# Altium PCB Main_PCB_V1R0_DDMMYY.PcbDoc
Units mil, origin at the board's own origin, x right, y up, seen from the top; angles counter-clockwise.
Board outline 4000 x 6929.13 mil, 2 copper layers (Top Layer, Bottom Layer), stack 58.66 mil thick; 97 components, 45 nets, 274 pads, 18 vias.
Unrouted connection lines stored in the file: 211.
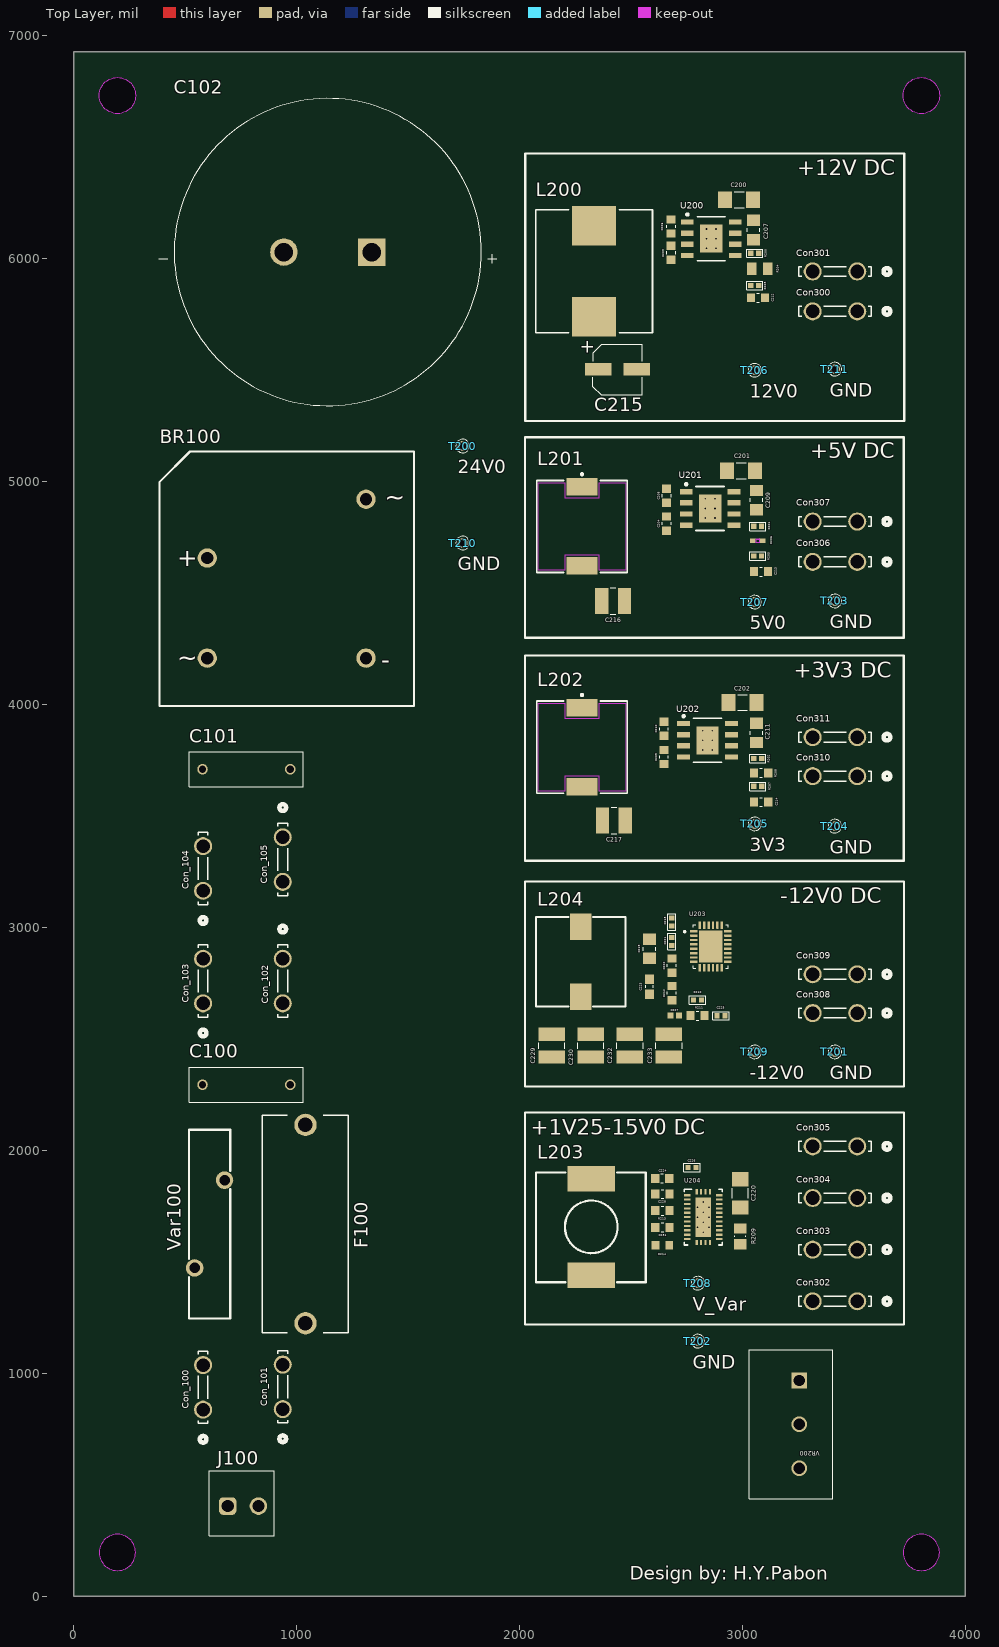
[diagram p0: Top Layer view]
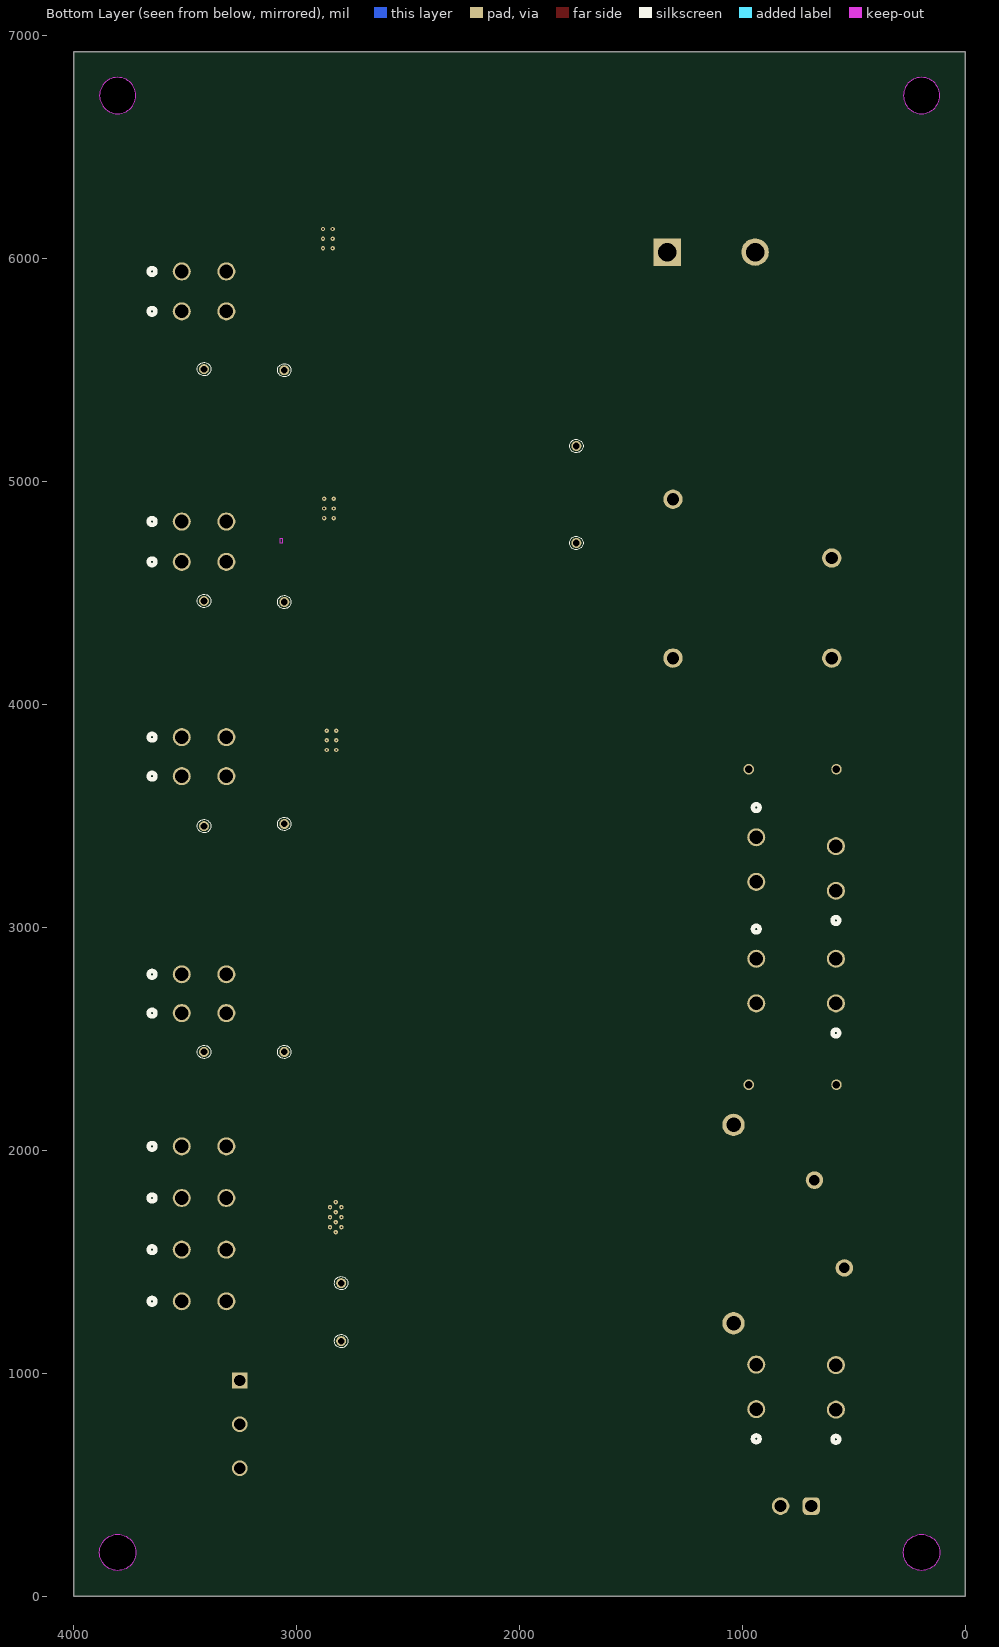
[diagram p1: Bottom Layer view, seen from below]

## Layer stack, top to bottom
Top Solder: solder mask 0.4, Solder Resist, Dk 3.5
Top Layer: signal copper 1.18
Dielectric 1: dielectric 56.3, FR-4, Dk 4.8
Bottom Layer: signal copper 1.18
Bottom Solder: solder mask 0.4, Solder Resist, Dk 3.5

## Board outline
0,0 0,6929.13 4000,6929.13 4000,0
cut-out: 115.22,196.85 ccw(c196.6,196.85) 196.6,115.47 ccw(c196.6,196.85) 277.98,196.85 ccw(c196.6,196.85) 196.6,278.23 ccw(c196.6,196.85)
cut-out: 3721.38,196.85 ccw(c3802.76,196.85) 3802.76,115.47 ccw(c3802.76,196.85) 3884.14,196.85 ccw(c3802.76,196.85) 3802.76,278.23 ccw(c3802.76,196.85)
cut-out: 3802.76,6650.91 cw(c3802.76,6732.28) 3721.38,6732.28 cw(c3802.76,6732.28) 3802.76,6813.66 cw(c3802.76,6732.28) 3884.14,6732.28 cw(c3802.76,6732.28)
cut-out: 196.6,6650.91 cw(c196.6,6732.28) 115.22,6732.28 cw(c196.6,6732.28) 196.6,6813.66 cw(c196.6,6732.28) 277.98,6732.28 cw(c196.6,6732.28)

## Design rules (kind name [scope] priority, off if disabled: settings)
Clearance [All] p1: gap=10 ignorepadtopadclearanceinfootprint=FALSE
PolygonConnect [All] p1: connectstyle=Relief reliefconductorwidth=10 reliefentries=4 polygonreliefangle="90 Angle" airgapwidth=10
RoutingVias [All] p1: holewidth=28 width=50 viastyle="Through Hole" minholewidth=28 minwidth=50 maxholewidth=28 maxwidth=50
SolderMaskExpansion [All] p1: expansion=4 istentingtop=FALSE
SupplyNets "Schematic Supply Nets_9" [InNet('-12V0')] p1: voltage=0.000
SupplyNets "Schematic Supply Nets_2" [InNet('var')] p2: voltage=0.000
SupplyNets "Schematic Supply Nets_8" [InNet('12V0')] p3: voltage=0.000
SupplyNets "Schematic Supply Nets_5" [InNet('24V')] p4: voltage=0.000
SupplyNets "Schematic Supply Nets_4" [InNet('5V0')] p5: voltage=0.000
SupplyNets "Schematic Supply Nets_3" [InNet('3V3')] p6: voltage=0.000
SupplyNets "Schematic Supply Nets_1" [InNet('24V0')] p7: voltage=0.000
SupplyNets "Schematic Supply Nets" [InNet('GND')] p8: voltage=0.000
Width [All] p1: maxlimit=10 minlimit=10 preferedwidth=10
30 further rules are at their usual default settings.

## Classes and differential pairs
component class 300_Externals: Con300 Con301 Con302 Con303 Con304 Con305 Con306 Con307 Con308 Con309 Con310 Con311
component class 200_DC-DC: C200 C201 C202 C203 C204 C205 C206 C207 C208 C209 C210 C211 C212 C213 C214 C215 C216 C217 C218 C219 C220 C221 C222 C223 C224 C225 C226 C227 C228 C229 C230 C231 C232 C233 L200 L201 L202 L203 L204 R200 R201 R202 R203 R204 R205 R206 R207 R208 R209 R210 R211 R212 R213 R214 T200 T201 T202 T203 T204 T205 T206 T207 T208 T209 T210 T211 U200 U201 U202 U203 U204 VR200
component class 100_AC-DC: BR100 C100 C101 C102 Con_100 Con_101 Con_102 Con_103 Con_104 Con_105 F100 J100 SW100 Var100

## Components (designator, comment, footprint, x,y, rotation, side; value= is the part's Value field where it differs from the comment)
BR100 "1kV_35A" BR_1kV_35A_GBPC-W 955.49,4565 r0 top
C100 "2.2nF_300V" Cap_2.2nF_300V 775,2295 r180 top value=2.2nF
C101 "2.2nF_300V" Cap_2.2nF_300V 775,3710 r0 top value=2.2nF
C102 "4700uF_63V" C_4700uF_63V_Electrolytic 1140,6030 r180 top value=4700uF
C200 "10uF 50V" 1206 2985,6265 r0 top value=10uF
C201 "10uF 50V" 1206 2994.1,5049.7 r0 top value=10uF
C202 "10uF 50V" 1206 2999.7,4009.7 r0 top value=10uF
C203 "100nF 25V" 0603 2680,6027 r90 top value=0.1uF
C204 "100nF 25V" 0603 2660,4812 r90 top value=0.1uF
C205 "100nF 25V" 0603 2648.35,3765 r90 top value=0.1uF
C206 "100nF 25V" 0603 2680,6145 r270 top value=0.1uF
C207 "1uF 25V" 0805#1 3049.8,6128.9 r90 top value=1uF
C208 "100nF 25V" 0603 2660,4937 r270 top value=0.1uF
C209 "1uF 25V" 0805#1 3062.88,4917.22 r90 top value=1uF
C210 "100nF 25V" 0603 2648.35,3891.5 r270 top value=0.1uF
C211 "1uF 25V" 0805#1 3063.34,3873.34 r90 top value=1uF
C212 "100pF 550" 0603 3070.28,5825 r0 top value=100pF
C213 "100pF 550" 0603 3083.35,4596.81 r0 top value=100pF
C214 "100pF 550" 0603 3083.82,3563.34 r180 top value=100pF
C215 "47uF 35V" RADIAL-CAN-SMD_Diax5mm_Hx6.1mm 2440,5505 r0 top value=47uF
C216 "47uF 1210" 1210 2420,4465 r0 top value=47uF
C217 "47uF 1210" 1210 2423.35,3480 r0 top value=47uF
C218 "0.1uF 50V" 0402 2683.34,3024.9 r270 top value=0.1uF
C219 "22uF 25V" 0805#1 2583.34,2904.9 r270 top value=22uF
C220 "10uF 50V" 1206 2990,1808 r90 top value=10uF
C221 "2.2uF" 0402 2683.34,2937.46 r90 top
C222 "10nF 50V" 0603 2683.34,2829.31 r90 top value=10nF
C223 "3.3nF_25V" Cap_3.3nF_25V_X7R0603 2583.34,2734.9 r90 top value=3.3nF
C224 "0.47uF 25V" 0603 2640,1875 r180 top value=0.47uF
C225 "0.1uF 50V" 0402 2904.06,2604.9 r0 top value=0.1uF
C226 "2.2uF" 0402 2773.51,1923.6 r0 top
C227 "220pF 50V" 0402_RF 2696.34,2604.9 r0 top value=220pF
C228 "150pF 50V" 0603 2640.91,1805 r0 top value=150pF
C229 "22uF 25V" 1210 2145,2470 r90 top value=22uF
C230 "22uF 25V" 1210 2320,2470 r90 top value=22uF
C231 "47pF 16V" 0603 2640.91,1655 r0 top value=47pF
C232 "22uF 25V" 1210 2495,2470 r90 top value=22uF
C233 "22uF 25V" 1210 2670,2470 r90 top value=22uF
Con300 "C_2x1_TH" Con_2x1_TH_6.3mm 3415,5763.97 r180 top
Con301 "C_2x1_TH" Con_2x1_TH_6.3mm 3415,5943.04 r180 top
Con302 "C_2x1_TH" Con_2x1_TH_6.3mm 3415,1323.67 r180 top
Con303 "C_2x1_TH" Con_2x1_TH_6.3mm 3415,1555.33 r180 top
Con304 "C_2x1_TH" Con_2x1_TH_6.3mm 3415,1787 r180 top
Con305 "C_2x1_TH" Con_2x1_TH_6.3mm 3415,2018.67 r180 top
Con306 "C_2x1_TH" Con_2x1_TH_6.3mm 3415,4640.37 r180 top
Con307 "C_2x1_TH" Con_2x1_TH_6.3mm 3415,4821.37 r180 top
Con308 "C_2x1_TH" Con_2x1_TH_6.3mm 3415,2616.49 r180 top
Con309 "C_2x1_TH" Con_2x1_TH_6.3mm 3415,2790.46 r180 top
Con310 "C_2x1_TH" Con_2x1_TH_6.3mm 3415,3679.16 r180 top
Con311 "C_2x1_TH" Con_2x1_TH_6.3mm 3415,3854.01 r180 top
Con_100 "C_2x1_TH" Con_2x1_TH_6.3mm 580.72,937.58 r90 top
Con_101 "C_2x1_TH" Con_2x1_TH_6.3mm 938,939.81 r90 top
Con_102 "C_2x1_TH" Con_2x1_TH_6.3mm 938,2760 r270 top
Con_103 "C_2x1_TH" Con_2x1_TH_6.3mm 580.72,2760 r90 top
Con_104 "C_2x1_TH" Con_2x1_TH_6.3mm 580.72,3265 r90 top
Con_105 "C_2x1_TH" Con_2x1_TH_6.3mm 938,3305 r270 top
F100 "500V 10A" FUSE_HLD_CARTRIDGE_5x20mm 1040,1670 r90 top
J100 "Con_2P" CON_2x1_TH_3.5mm_TB 760,405 r0 top
L200 "6uH_9.5A" L_6uH_9.5A_SMD,13x12.8mm 2334.62,5944.18 r270 top value=6uH
L201 "4.7uH_5A" L_4.7uH_7A_SMD 2280.49,4799.18 r0 top value=4.7uH
L202 "4.7uH_7A" L_4.7uH_7A_SMD 2280.49,3809.18 r0 top value=4.7uH
L203 "SMDRI127-150MT" L_15uH_4.5A_SMD,12.3x12.3mm 2321.91,1657.52 r270 top value=15uH
L204 "7.8uH_8A" L_7.8uH_8A_SMD,10.5x10.2mm 2068.88,3067.09 r270 top value=7.8uH
R200 "100K 1/16W" 0402 3055,6025 r180 top value=100k
R201 "100K 1/16W" 0402 3068.08,4799.59 r180 top value=100k
R202 "100K 1/16W" 0402 3068.54,3758.34 r180 top value=100k
R203 "10k 1/16W" 0402 3055,5880 r180 top value=10k
R204 "523 OHM_130mW" Res_523_SMD0805_130mW 3077.36,5955 r0 top value=523
R205 "10k 1/16W" 0402 3068.08,4666.81 r180 top value=10k
R206 "1.37k_100mW" Res_1.37k_0402_100mW 3069.05,4735 r180 top value=1.37k
R207 "100K 1/16W" 0402 3068.53,3633.33 r0 top value=100k
R208 "22k1 1/10W" 0603 3083.82,3693.34 r180 top value=22k1
R209 "100k 1/8W" 0805#2 2990,1615 r90 top value=100k
R210 "100K 1/16W" 0402 2798.34,2674.9 r0 top value=100k
R211 "240k 1/10W" 0603 2798.34,2604.9 r0 top value=240k
R212 "1k33 1/10W" 0603 2683.34,2705.89 r270 top value=1k33
R213 "100k 1/10W" 0603 2640.91,1730 r180 top value=100k
R214 "MCR03EZPFX7151" "RES 7.15k_SMD-0603" 2640.91,1575 r0 top value=7.15k
T200 "24V0" TP_TH_30mil 1745,5160 r90 top
T201 "GND" TP_TH_30mil 3415,2442.31 r90 top
T202 "GND" TP_TH_30mil 2800,1145 r90 top
T203 "GND" TP_TH_30mil 3415,4465 r90 top
T204 "GND" TP_TH_30mil 3415,3455 r90 top
T205 "3V3" TP_TH_30mil 3055,3465 r90 top
T206 "12V0" TP_TH_30mil 3055,5500 r90 top
T207 "5V0" TP_TH_30mil 3055,4460 r90 top
T208 "V_Var" TP_TH_30mil 2800,1405 r90 top
T209 "-12V0" TP_TH_30mil 3055,2442.31 r90 top
T210 "GND" TP_TH_30mil 1745,4725 r90 top
T211 "GND" TP_TH_30mil 3415,5505 r90 top
U200 "SY8205FCC" SOIC127P600X140_HS-9N 2860,6090 r0 top
U201 "SY8205FCC" SOIC127P600X140_HS-9N 2855,4880 r0 top
U202 "SY8205FCC" SOIC127P600X140_HS-9N 2843.35,3840 r0 top
U203 "IC REG BUCK ADJ 4A 28QFN" "IC REG BUCK ADJ 4A 28QFN" 2858.34,2914.9 r0 top
U204 "LM76003RNPR" DCDC_ADJ_3.5A_WQFN-30-EP(4x6) 2824.36,1701.04 r0 top
Var100 "VAR_423V~517V_6.5kA" "VARISTOR 423V~517V 6.5kA P=10mm" 610,1670 r90 top
VR200 "500k 1/5W" Pot_3x1_5mm_TH 3255,771.85 r0 top value=500k

## Footprints (in the part's own frame and the unit in brackets; to place one, negate y for a bottom-side part, rotate by r counter-clockwise, add the part's x,y. Pads: shape width x height; smd on the part's side, far side on the other; paste and mask are expansions set on the pad)
0402 [mm] "1005 Metric / 20190221 / C-A.Serna.A"
  rect 0.6x0.6 smd: 1(-0.45,0) 2(0.45,0)
  silkscreen extent -0.92,-0.47 0.92,0.47, body extent -0.5,-0.25 0.5,0.25, height 0.55
0402_RF [mil] "1005 Metric / 20190221 / C-A.Serna.A"
  rect 27x27 smd: 1(-19.5,0) 2(19.5,0)
  body extent -20,-10 19,10, height 22
0603 [mil] "1608 Metric / 20190221 / C-A.Serna.A"
  rect 37x40 smd: 1(-31.5,0) 2(31.5,0)
  silkscreen extent -6,-20 6,20, body extent -31,-16 32,16, height 12
0805#1 [mm] "2012 Metric / 20190221 / C-A.Serna.A"
  rect 1.3x1.5 smd: 1(-1.1,0) 2(1.1,0)
  silkscreen extent -0.2,-0.7 0.2,0.7, body extent -1.13,-0.7 1.07,0.7, height 1
0805#2 [mm] "2012 metric/ 20190327 / V-A.Patino"
  rect 1.15x1.45 smd: 1(-0.9,0) 2(0.9,0)
  silkscreen extent -0.05,-0.62 0.05,0.63, body extent -1.1,-0.72 1.1,0.73, height 1.3
1206 [mm] "3216 Metric / 20190221 / C-A.Serna.A"
  rect 1.6x1.9 smd: 1(-1.6,0) 2(1.6,0)
  silkscreen extent -0.55,-0.9 0.57,0.9, body extent -1.6,-0.8 1.6,0.8, height 2
1210 [mm] "3225 Metric / 20190221 / C-A.Serna.A"
  rect 1.5x3 smd: 1(-1.3,0) 2(1.3,0)
  silkscreen extent -0.32,-1.5 0.31,1.5, body extent -1.78,-1.4 1.72,1.4, height 2.8
BR_1kV_35A_GBPC-W [mm] "/20261030/H.Y.Pabón"
  round 2.2 hole 1.4: 1(-9.05,2.35) 2(-9.05,-9.05) 3(9.05,-9.05) 4(9.05,9.05)
  silkscreen extent -14.5,-14.5 14.5,14.5
C_4700uF_63V_Electrolytic [mm] "/20261030/H.Y.Pabón"
  rect 3.116x3.116 / inner round 3.116 / far side rect 3.116x3.116 hole 2.1 mask+0.102: 1(-5,0)
  round 3.116 hole 2.1 mask+0.102: 2(5,0)
  silkscreen extent -19.25,-17.5 19.25,17.5, body extent -17.5,-17.48 17.5,17.49, height 37
Cap_2.2nF_300V [mm] "/20261111/H.Y.Pabón"
  round 1.2 hole 0.85 mask+0.102: 1(-5,0) 2(5,0)
  silkscreen extent -6.5,-2 6.5,2, body extent -6.5,-2 6.5,2, height 9
Cap_3.3nF_25V_X7R0603 [mm] "/20261028/"
  rect 1.1x1 smd paste+0 mask+0.102: 1(-0.85,0) 2(0.85,0)
  silkscreen extent -0.15,-0.45 0.15,0.45, body extent -0.8,-0.4 0.8,0.4, height 0.9
CON_2x1_TH_3.5mm_TB [mm] "/ 20190222 / C-A.Serna.A"
  rrect50% 2x2 hole 1.397: 1(-1.75,0)
  round 2 hole 1.397: 2(1.75,0)
  silkscreen extent -3.87,-3.4 3.53,4, body extent -3.87,-3.4 3.53,4, height 8.6
Con_2x1_TH_6.3mm [mil] "/20261111/"
  round 81 hole 61: 1(-100,0) 2(100,0)
  silkscreen extent -248,-22 162,22, body extent -131,-31 180,0, height 531
DCDC_ADJ_3.5A_WQFN-30-EP(4x6) [mm] "/20261027/"
  rect 0.75x0.25 smd paste+0 mask+0.051: 1(-1.825,2.5) 2(-1.825,2) 3(-1.825,1.5) 4(-1.825,1) 5(-1.825,0.5) 6(-1.825,0) 7(-1.825,-0.5) 8(-1.825,-1) 9(-1.825,-1.5) 10(-1.825,-2) 11(-1.825,-2.5) 16(1.825,-2.5) 17(1.825,-2) 18(1.825,-1.5) 19(1.825,-1) 20(1.825,-0.5) 21(1.825,0) 22(1.825,0.5) 23(1.825,1) 24(1.825,1.5) 25(1.825,2) 26(1.825,2.5)
  rect 0.25x0.6 smd paste+0 mask+0.051: 12(-0.75,-2.9) 13(-0.25,-2.9) 14(0.25,-2.9) 15(0.75,-2.9) 27(0.75,2.9) 28(0.25,2.9) 29(-0.25,2.9) 30(-0.75,2.9)
  rect 1.8x4.5 smd paste-2.237 mask+0.051: 31(0,0)
  round 0.5 / inner round 1.524 / far side round 0.5 hole 0.203 paste-2539.97 mask+0.051: V(-0.65,-1.14) V(-0.65,0) V(-0.65,1.14) V(0,-1.71) V(0,-0.57) V(0,0.57) V(0,1.71) V(0.65,-1.14) V(0.65,0) V(0.65,1.14)
  silkscreen extent -2.17,-3.17 2.17,3.17
FUSE_HLD_CARTRIDGE_5x20mm [mil] "/20201016/C-A.Serna.A"
  round 100 hole 65: 1(-444.88,0) 2(444.88,0)
  silkscreen extent -488,-192 488,194, body extent -488,-192 488,194, height 506
"IC REG BUCK ADJ 4A 28QFN" [mm] "/20261028/"
  rrect25% 0.86x0.27 smd paste+0 mask+0: 1(-1.935,1.75) 2(-1.935,1.25) 3(-1.935,0.75) 4(-1.935,0.25) 5(-1.935,-0.25) 6(-1.935,-0.75) 7(-1.935,-1.25) 8(-1.935,-1.75) 15(1.935,-1.75) 16(1.935,-1.25) 17(1.935,-0.75) 18(1.935,-0.25) 19(1.935,0.25) 20(1.935,0.75) 21(1.935,1.25) 22(1.935,1.75)
  rrect25% 0.27x0.86 smd paste+0 mask+0: 9(-1.25,-2.435) 10(-0.75,-2.435) 11(-0.25,-2.435) 12(0.25,-2.435) 13(0.75,-2.435) 14(1.25,-2.435) 23(1.25,2.435) 24(0.75,2.435) 25(0.25,2.435) 26(-0.25,2.435) 27(-0.75,2.435) 28(-1.25,2.435)
  rect 2.65x3.65 smd paste-3 mask+0.05: 29(0,0)
  silkscreen extent -3.09,-2.5 2,2.5
L_4.7uH_7A_SMD [mm] "SMD Shielded Power Inductor, 2-leads, body 10x10mm"
  rect 3.5x2 smd: 1(0,4.5) 2(0,-4.5)
  Top Layer keep-out region: 5,-5 1.95,-5 1.95,-3.3 -1.95,-3.3 -1.95,-5 -5,-5 -5,5 -1.95,5 -1.95,3.3 1.95,3.3 1.95,5 5,5
  silkscreen extent -5.15,-5.25 5.15,6.07, body extent -5,-5 5,5, height 2.85
L_6uH_9.5A_SMD,13x12.8mm [mm] "SMolded Inductor, 2-Leads, Body 13,00x12,80mm, IPC Medium Density"
  rect 4.5x5 smd: 1(-5.175,0) 2(5.175,0)
  silkscreen extent -7,-6.65 7,6.65, body extent -7.22,-6.65 7.22,6.65, height 5
L_7.8uH_8A_SMD,10.5x10.2mm [mm] "/20261028/"
  rect 3x2.4 smd: 1(1.602,5.227) 2(9.601,5.227)
  silkscreen extent 0.5,0.13 10.7,10.33
L_15uH_4.5A_SMD,12.3x12.3mm [mm]
  rect 2.9x5.4 smd paste+0 mask+0.05: 1(-5.5,0) 2(5.5,0)
  silkscreen extent -6.2,-6.3 6.3,6.2
Pot_3x1_5mm_TH [mm] "20190528/ V-A.Patino"
  rect 1.8x1.8 hole 1.27: 1(0,5)
  round 1.8 hole 1.27: 2(0,0) 3(0,-5)
  silkscreen extent -5.7,-8.5 3.8,8.5, body extent -5.64,-8.55 18.86,8.45, height 21
RADIAL-CAN-SMD_Diax5mm_Hx6.1mm [mm] "20190618 / M.X-Arias"
  rect 3x1.4 smd: 1(-2.2,0) 2(2.2,0)
  silkscreen extent -2.82,-2.92 2.82,2.84, body extent -3.24,-2.73 3.26,2.79, height 6.15
"RES 7.15k_SMD-0603" [mm] "RES 7.15kΩ ±1% 100mW 0603"
  rect 0.87x0.93 smd paste+0 mask+0.102: 1(-0.78,0) 2(0.78,0)
  body extent -0.8,-0.4 0.8,0.4, height 0.55
Res_1.37k_0402_100mW [mm] "/20261023/ H.Y.Pabón"
  rect 0.656x0.5 smd paste+0 mask+0: 1(-0.528,-0.001) 2(0.578,-0.001)
  Top Layer keep-out region: -0.149,-0.2 -0.149,0.199 0.199,0.199 0.199,-0.2
  Keep-Out Layer region: -0.149,-0.251 -0.149,0.249 0.199,0.249 0.199,-0.251
  body extent -0.5,-0.25 0.55,0.25, height 0.71
Res_523_SMD0805_130mW [mm] "RES 523Ω ±0.1% 130mW 0805"
  rect 1.1x1.45 smd: 1(-0.9,0) 1(-0.9,0) 2(0.9,0) 2(0.9,0)
  body extent -1.1,-0.72 1.1,0.72, height 0.5
SOIC127P600X140_HS-9N [mm] "SOIC, 8-Leads, Body 4,90x3,90mm, Pitch 1,27mm, Thermal Pad 3,20x2,55mm, IPC Medium Density"
  rect 1.45x0.6 smd: 1(-2.725,1.905) 2(-2.725,0.635) 3(-2.725,-0.635) 4(-2.725,-1.905) 5(2.725,-1.905) 6(2.725,-0.635) 7(2.725,0.635) 8(2.725,1.905)
  rect 2.55x3.2 smd: 9(0,0)
  silkscreen extent -2.85,-2.5 1.6,2.88, body extent -3,-2.5 3,2.5, height 1.4
TP_TH_30mil [mil] "/ 20190222 / C-A.Serna.A"
  round 45 hole 30: 1(0,0)
  silkscreen extent -30,-30 30,30
"VARISTOR 423V~517V 6.5kA P=10mm" [mm] "/20261111/H.Y.Pabón"
  round 2 hole 1.2 paste-2539.97 mask+0.05: 1(-5,1.7) 2(5,-1.7)
  silkscreen extent -10.75,-2.35 10.75,2.35

## Part data
BR100: library part BR_1kV_35A_GBPC-W, "BRIDGE RECT 1kV 35A GBPC-W", Manufacturer=VISHAY, Manufacturer Part Number=GBPC3510W-E4/51, Supplier Part Number 1=C435891, ComponentLink1Description=LCSC, ComponentLink1URL=https://www.lcsc.com/es/product-detail/C435891.html?s_z=n_q_GBPC3510&spm=wm.fly.bg.0.xh&lcsc_vid=TwUMAgFRQ1ZdBABSRVJXAwZQE1ANUAIARVkMAlZRRVUxVlNfRFJWV1RXRVBZUjsOAxUeFF5JWBYZEEoKFBINSQcJGk4LFEsFFhULAAsUDk5fVVBIHxUDCw%3D%3D, ComponentLink2Description=DataSheet, ComponentLink2URL=https://www.lcsc.com/datasheet/C435891.pdf?spm=wm.sxq.inf.ggs___wm.fly.bg.0.xh&lcsc_vid=TwUMAgFRQ1ZdBABSRVJXAwZQE1ANUAIARVkMAlZRRVUxVlNfRFJWV1RXRVBZUjsOAxUeFF5JWBYZEEoKFBINSQcJGk4LFEsFFhULAAsUDk5fVVBIHxUDCw%3D%3D, Last modified by=H.Y.Pabón, Last modified date=20261030, Reel Stock=N/A, Supplier 1=LCSC
C100 C101: library part Cap_2.2nF_300V_TH, "CAP SAFETY 2.2nF ±10% 300V TH", Manufacturer=TDK, Manufacturer Part Number=B32021A3222K000, Supplier Part Number 1=C341260, ComponentLink1Description=LCSC, ComponentLink1URL=https://www.lcsc.com/es/product-detail/C341260.html?s_z=n_q_t_y2%2520capacitor&spm=wm.fly.bg.0.xh&lcsc_vid=Q1RbAgBVRVQPAlZeQVRYVAdeFgVZXwFeTgNaVQJTEwUxVlNfQ1VaXlJRT1dbVzsOAxUeFF5JWBYZEEoKFBINSQcJGk4LFEsVEgAcBAw%3D, ComponentLink2Description=DataSheet, ComponentLink2URL=https://www.lcsc.com/datasheet/C341260.pdf?spm=wm.sxq.inf.ggs___wm.fly.bg.0.xh&lcsc_vid=Q1RbAgBVRVQPAlZeQVRYVAdeFgVZXwFeTgNaVQJTEwUxVlNfQ1VaXlJRT1dbVzsOAxUeFF5JWBYZEEoKFBINSQcJGk4LFEsVEgAcBAw%3D, Last modified by=H.Y.Pabón, Last modified date=20261111, Reel Stock=N/A, Supplier 1=LCSC
C102: library part C_4700uF_63V_Electrolytic, "4700 µF 63 V Aluminum Electrolytic Capacitors Radial, Can - Snap-In 3000 Hrs @ 105°C", Manufacturer=Nichicon, Manufacturer Part Number=LGU1J472MELC, Supplier Part Number 1=493-8446-ND, ComponentLink1Description=DIGIKEY, ComponentLink1URL=https://www.digikey.com/en/products/detail/nichicon/LGU1J472MELC/2540661, ComponentLink2Description=DataSheet, ComponentLink2URL=https://www.nichicon.co.jp/english/series_items/catalog_pdf/e-lgu.pdf, Last modified by=H.Y.Pabón, Last modified date=20261030, Reel Stock=N/A, Supplier 1=Digi-Key
C200 C201 C202 C220: library part Cap_10uF_1206_50V, "CAP CER 10UF 50V X5R 1206", Manufacturer="Murata Electronics North America", Manufacturer Part Number=GRT31CR61H106ME01L, Supplier Part Number 1=490-12457-1-ND, ComponentLink1Description=Digi-Key, ComponentLink1URL=https://www.digikey.com/product-detail/en/murata-electronics-north-america/GRT31CR61H106ME01L/490-12457-1-ND/5417158, Last modified by=J.Jaramillo, Last modified date=20240309, Supplier 1=Digi-Key
C203 C204 C205 C206 C208 C210: library part Cap_0.1uF_0603_25V, "CAP CER 0.1UF 25V X7R 0603", Manufacturer=TDK, Manufacturer Part Number=CGA3E2X7R1E104K080AA, Supplier Part Number 1=445-5667-1-ND, ComponentLink1Description=Digi-key, ComponentLink1URL=https://www.digikey.com/en/products/detail/tdk-corporation/CGA3E2X7R1E104K080AA/2443145?s=N4IgTCBcDaIMIHECCBmAomAGgdgEoEY18AGAFgGliAOYpJEAXQF8g, Last modified by=J.Jaramillo, Last modified date=20240309, Supplier 1=Digi-Key
C207 C209 C211: library part Cap_1uF_0805_25V, "CAP CER 1UF 25V X7R 0805", Manufacturer=Yageo, Manufacturer Part Number=CC0805KKX7R8BB105, Supplier Part Number 1=311-1456-1-ND, ComponentLink1Description=Digi-Key, ComponentLink1URL=https://www.digikey.com/product-detail/en/yageo/CC0805KKX7R8BB105/311-1456-1-ND/2833762, Last modified by=J.Jaramillo, Last modified date=20240309, Supplier 1=Digi-Key
C212 C213 C214: library part Cap_100pF_0603_50V, "CAP CER 100PF 50V C0G/NPO 0603", Manufacturer=Yageo, Manufacturer Part Number=CC0603JRNPO9BN101, Supplier Part Number 1=311-1069-1-ND, ComponentLink1Description=Digi-key, ComponentLink1URL=https://www.digikey.com/en/products/detail/yageo/CC0603JRNPO9BN101/302803?s=N4IgTCBcDaIMwEYEFoEAYBsBOVyByAIiALoC%2BQA, Last modified by=J.Jaramillo, Last modified date=20240309, Reel Stock=N/A, Supplier 1=Digi-Key
C215: library part Cap_47uF_35V_ALU_SMD, "CAP ALUM 47UF 20% 35V SMD", Manufacturer="Panasonic Electronic Components", Manufacturer Part Number=EEEFT1V470AR, Supplier Part Number 1=PCE5014CT-ND, ComponentLink1Description=Digi-Key, ComponentLink1URL=https://www.digikey.com/product-detail/en/panasonic-electronic-components/EEE-FT1V470AR/PCE5014CT-ND/2652069, Last modified by=J.Jaramillo, Last modified date=20240309, Supplier 1=Digi-Key
C216 C217: library part Cap_47uF_1210_16V_1, "CAP CER 47UF 16V X5R 1210", Manufacturer="Taiyo Yuden", Manufacturer Part Number=EMK325BJ476MM-T, Supplier Part Number 1=587-1436-1-ND, ComponentLink1Description=Digi-Key, ComponentLink1URL=https://www.digikey.com/en/products/detail/taiyo-yuden/EMK325BJ476MM-T/1004067, Last modified by=J.Jaramillo, Last modified date=20240309, Supplier 1=Digi-Key
C218 C225: library part Cap_0.1uF_0402_50V, "CAP CER 0.1UF 50V X7R 0402", Manufacturer="Samsung Electro-Mechanics", Manufacturer Part Number=CL05B104KB54PNC, Supplier Part Number 1=1276-CL05B104KB54PNCCT-ND, ComponentLink1Description=Digi-Key, ComponentLink1URL=https://www.digikey.com/en/products/detail/samsung-electro-mechanics/CL05B104KB54PNC/11487801?s=N4IgTCBcDaIMIBkAMBWAQgRiQFgNJpWwAUA5OEAXQF8g, Last modified by=J.Jaramillo, Last modified date=20240309, Supplier 1=Digi-Key
C219: library part Cap_22uF_0805_25V, "CAP CER 22UF 25V X5R 0805", Manufacturer="Samsung Electro-Mechanics", Manufacturer Part Number=CL21A226MAYNNNE, Supplier Part Number 1=1276-CL21A226MAYNNNECT-ND, ComponentLink1Description=Digi-Key, ComponentLink1URL=https://www.digikey.com/en/products/detail/samsung-electro-mechanics/CL21A226MAYNNNE/10479857, Last modified by=J.Jaramillo, Last modified date=20240309, Supplier 1=Digi-Key
C221 C226: library part Cap_2.2uF_0402_10V, "CAP CER 2.2UF 10V X5R 0402", Manufacturer=Yageo, Manufacturer Part Number=CC0402KRX5R6BB225, Supplier Part Number 1=311-1686-1-ND, ComponentLink1Description=Digikey, ComponentLink1URL=https://www.digikey.com/en/products/detail/yageo/CC0402KRX5R6BB225/5195095, Last modified by=J.Jaramillo, Last modified date=20240309, Supplier 1=Digikey
C222: library part Cap_10000pF_0603_50V, "CAP CER 10000PF 50V X7R 0603", Manufacturer=Yageo, Manufacturer Part Number=CC0603JRX7R9BB103, Supplier Part Number 1=311-1778-1-ND, ComponentLink1Description=Digi-key, ComponentLink1URL=https://www.digikey.com/en/products/detail/yageo/CC0603JRX7R9BB103/5195187, Last modified by=J.Jaramillo, Last modified date=20240309, Reel Stock=N/A, Supplier 1=Digi-Key
C223: library part Cap_3.3nF_25V_X7R0603, "CAP CER 3.3nF 25V X7R 0603", Manufacturer=YAGEO, Manufacturer Part Number=CC0603KRX7R8BB332, Supplier Part Number 1=C519423, ComponentLink1Description=LCSC, ComponentLink1URL=https://www.lcsc.com/es/product-detail/C519423.html?s_z=n_q_t_capacitor%25203.3nF&spm=wm.fly.bg.14.xh___wm.ssy.tc.0.tz&lcsc_vid=FllXAlYHRVNaVVBUTlhdBgZUE1dfAlNXEVBWXlEAFVYxVlNfRFNdUlNVQFdcXjsOAxUeFF5JWBYZEEoKFBINSQcJGk4LFEsFFhULAAsUDk5fVlxXWQkaCgg%3D, ComponentLink2Description=DataSheet, ComponentLink2URL=https://www.lcsc.com/datasheet/C519423.pdf?spm=wm.sxq.inf.ggs___wm.fly.bg.14.xh&lcsc_vid=FllXAlYHRVNaVVBUTlhdBgZUE1dfAlNXEVBWXlEAFVYxVlNfRFNdUlNVQFdcXjsOAxUeFF5JWBYZEEoKFBINSQcJGk4LFEsFFhULAAsUDk5fVlxXWQkaCgg%3D, Last modified by=H.Y.Pabón, Last modified date=20261028, Reel Stock=N/A, Supplier 1=LCSC
C224: library part Cap_0.47uF_0603_25V, "CAP CER 0.47UF 25V X7R 0603", Manufacturer="Walsin Technologies", Manufacturer Part Number=0603B474K250CT, Supplier Part Number 1=1292-1452-1-ND, ComponentLink1Description=Digi-key, ComponentLink1URL=https://www.digikey.com/en/products/detail/walsin-technology-corporation/0603B474K250CT/9354949?s=N4IgTCBcDaIAwDY4GYBCAWA7Og0mArHAMIAqIAugL5A, Last modified by=J.Jaramillo, Last modified date=20240309, Supplier 1=Digi-Key
C227: library part Cap_220pF_0402_50V, "CAP CER 220PF 50V C0G/NP0 0402", Manufacturer="Murata Electronics", Manufacturer Part Number=GCM1555C1H221JA16D, Supplier Part Number 1=490-4927-1-ND, ComponentLink1Description=Digi-key, ComponentLink1URL=https://www.digikey.com/en/products/detail/murata-electronics/GCM1555C1H221JA16D/1765175, Last modified by=J.Jaramillo, Last modified date=20240309, Supplier 1=Digi-key
C228: library part Cap_150pF_0603_50V, "CAP CER 150PF 50V X7R 0603", Manufacturer="Samsung Electro-Mechanics", Manufacturer Part Number=CL10B151KB8NNNC, Supplier Part Number 1=1276-1956-1-ND, ComponentLink1Description=Digi-Key, ComponentLink1URL=https://www.digikey.com/product-detail/en/samsung-electro-mechanics/CL10B151KB8NNNC/1276-1956-1-ND/3890042, Last modified by=J.Jaramillo, Last modified date=20240309, Reel Stock=N/A, Supplier 1=Digi-Key
C229 C230 C232 C233: library part Cap_22uF_1210_25V, "CAP CER 22UF 25V X5R 1210", Manufacturer="KYOCERA AVX", Manufacturer Part Number=12103D226KAT2A, Supplier Part Number 1=478-5999-1-ND, ComponentLink1Description=Digi-Key, ComponentLink1URL=https://www.digikey.com/en/products/detail/kyocera-avx/12103D226KAT2A/2208898?s=N4IgTCBcDaIIxjgBgMwBExgGwGkCCAKmHiALoC%2BQA, Last modified by=J.Jaramillo, Last modified date=20240309, Supplier 1=Digi-Key
C231: library part Cap_47pF_0603_50V, "CAP CER 47PF 50V C0G/NP0 0603", Manufacturer=Yageo, Manufacturer Part Number=CC0603JRNPO9BN470, Supplier Part Number 1=311-1065-1-ND, ComponentLink1Description=Digi-Key, ComponentLink1URL=https://www.digikey.com/en/products/detail/yageo/CC0603JRNPO9BN470/302799?s=N4IgTCBcDaIMJwAwDZEGYBSAlAcgBQHkBOAIRwBYB2REAXQF8g, Last modified by=J.Jaramillo, Last modified date=20240309, Supplier 1=Digi-Key
Con300 Con301 Con302 Con303 Con304 Con305 Con306 Con307 Con308 Con309 Con310 Con311 Con_100 Con_101 Con_102 Con_103 Con_104 Con_105: library part Con_2x1_TH_6.3mm, "Through Hole Quick Connects, Quick Disconnect Connectors RoHS", Manufacturer="TE Connectivity", Manufacturer Part Number=2376591-2, Supplier Part Number 1=C3218571, ComponentLink1Description=LCSC, ComponentLink1URL=https://www.lcsc.com/es/product-detail/C3218571.html?s_z=n_q_2376591-2&spm=wm.fly.bg.0.xh&lcsc_vid=Q1RbAgBVRVQPAlZeQVRYVAdeFgVZXwFeTgNaVQJTEwUxVlNfQ1VaVVBVQVBcUTsOAxUeFF5JWBYZEEoKFBINSQcJGk4LFEsFFhULAAsUDk5fXldSWQkaCgg%3D, ComponentLink2Description=DataSheet, ComponentLink2URL=https://www.lcsc.com/datasheet/C3218571.pdf?spm=wm.sxq.inf.ggs___wm.fly.bg.0.xh&lcsc_vid=Q1RbAgBVRVQPAlZeQVRYVAdeFgVZXwFeTgNaVQJTEwUxVlNfQ1VaVVBVQVBcUTsOAxUeFF5JWBYZEEoKFBINSQcJGk4LFEsFFhULAAsUDk5fXldSWQkaCgg%3D, Last modified by=H.Y.Pabón, Last modified date=20261111, Reel Stock=N/A, Supplier 1=LCSC
F100: library part F_HLD_CARTRIDGE_5x20mm, "FUSE BLOK CARTRIDGE 500V 10A PCB", Manufacturer="Schurter Inc.", Manufacturer Part Number=0031.8201, Supplier Part Number 1=486-1258-ND, ComponentLink1Description=Digi-Key, ComponentLink1URL=https://www.digikey.com/en/products/detail/schurter-inc/0031-8201/669925?s=N4IgTCBcDaIAxwMwEYB0AOMdkgLoF8g, Last modified by=J.Jaramillo, Last modified date=20240309, Reel Sotck=N/A, Supplier 1=Digi-Key
J100: library part Con_2x1_TH_3.5mm, "TERM BLK 2POS SIDE ENT 3.5MM PCB", Manufacturer="Würth Elektronik", Manufacturer Part Number=691214110002, Supplier Part Number 1=732-2747-ND, ComponentLink1Description=Digi-key, ComponentLink1URL=https://www.digikey.com/product-detail/en/wurth-electronics-inc/691214110002/732-2747-ND/2508516, Last modified by=J.Jaramillo, Last modified date=20240310, Reel Stock=N/A, Supplier 1=Digi-Key
L200: library part L_6uH_9.5A_SMD,13x12.8mm, "9.5A 6uH ±20% 11.5A 14.85mΩ Molded inductor SMD,13x12.8mm Fixed Inductors", Manufacturer=Coilank, Manufacturer Part Number=APZBX1250M6R0, Supplier Part Number 1=C54623474, ComponentLink1Description=LCSC, ComponentLink1URL=https://www.lcsc.com/es/product-detail/C54623474.html?s_z=n_q_Coilank%2520APZBX1250M6R0&spm=wm.fly.bg.0.xh&lcsc_vid=QFZYVlcFRFBZAlcDFVQLVVBXQlJZV1IFTlhYAQVfQlcxVlNfRVleVlVTQVJZUDsOAxUeFF5JWBYZEEoKFBINSQcJGk4LFEsFFhULAAsUDk5fVl1fWQkaCgg%3D, ComponentLink2Description=DataSheet, ComponentLink2URL=https://www.lcsc.com/datasheet/C54623474.pdf?spm=wm.sxq.inf.ggs___wm.fly.bg.0.xh&lcsc_vid=QFZYVlcFRFBZAlcDFVQLVVBXQlJZV1IFTlhYAQVfQlcxVlNfRVleVlVTQVJZUDsOAxUeFF5JWBYZEEoKFBINSQcJGk4LFEsFFhULAAsUDk5fVl1fWQkaCgg%3D, Last modified by=H.Y.Pabón, Last modified date=20261023, Reel Stock=N/A, Supplier 1=LCSC
L201 L202: library part L_4.7uH_7A_SMD, "Inductores de potencia - SMD WE-PD 4.7uH 7A DCR=12.4mOhms AEC-Q200", Manufacturer="Wurth Elektronik", Manufacturer Part Number=7447714047, Supplier Part Number 1=710-7447714047, ComponentLink1Description=MOUSER, ComponentLink1URL=https://co.mouser.com/es/ProductDetail/Wurth-Elektronik/7447714047?qs=XJfXErqHgA5CSKkgffrfLQ%3D%3D, ComponentLink2Description=DataSheet, ComponentLink2URL=https://www.we-online.com/components/products/datasheet/7447714047.pdf, Last modified by=H.Y.Pabón, Last modified date=20261024, Reel Stock=N/A, Supplier 1=MOUSER
L203: library part L_15uH_4.5A_SMD,12.3x12.3mm, "FIXED IND 15uH 4.5A 27mΩ SMD,12.3x12.3mm", Manufacturer="Shun Xiang Nuo", Supplier Part Number 1=C40000, ComponentLink1Description=LCSC, ComponentLink1URL=https://www.lcsc.com/es/product-detail/C40000.html?s_z=n_q_t_inductor%252015uH&spm=wm.fly.bg.29.xh___wm.ssy.tc.0.tz&lcsc_vid=QlNYUQJQTlJZUFMERVVXUwJeTwJcUQUCFFBfX1MHEQAxVlNfRFBaVFVeRVFcUjsOAxUeFF5JWBYZEEoKFBINSQcJGk4LFEsVEgAcBAw%3D, ComponentLink2Description=DataSheet, ComponentLink2URL=https://www.lcsc.com/datasheet/C40000.pdf, Last modified by=H.Y.Pabón, Last modified date=20261027, Manufacturer Part Number=SMDRI127-150MT, Reel Stock=N/A, Supplier 1=LCSC
L204: library part L_7.8uH_8A_SMD,10.5x10.2mm, "FIXED IND 7.8uH 8A 13.6mΩ SMD,10.2x10.5mm", Manufacturer=KOHERelec, Manufacturer Part Number=FHC1050-7R8M, Supplier Part Number 1=C2761921, ComponentLink1Description=LCSC, ComponentLink1URL=https://www.lcsc.com/es/product-detail/C2761921.html?s_z=n_q_inductor%25207.8uH&spm=wm.fly.bg.3.xh&lcsc_vid=FllXAlYHRVNaVVBUTlhdBgZUE1dfAlNXEVBWXlEAFVYxVlNfRFNdVV1XQVBeVzsOAxUeFF5JWBYZEEoKFBINSQcJGk4LFEsFFhULAAsUDk5fVlxXWQkaCgg%3D, ComponentLink2Description=DataSheet, ComponentLink2URL=https://www.lcsc.com/datasheet/C2761921.pdf?spm=wm.sxq.inf.ggs___wm.fly.bg.3.xh&lcsc_vid=FllXAlYHRVNaVVBUTlhdBgZUE1dfAlNXEVBWXlEAFVYxVlNfRFNdVV1XQVBeVzsOAxUeFF5JWBYZEEoKFBINSQcJGk4LFEsFFhULAAsUDk5fVlxXWQkaCgg%3D, Last modified by=H.Y.Pabón, Last modified date=20261028, Reel Stock=N/A, Supplier 1=LCSC
R200 R201 R202 R207 R210: library part Res_100k_0402_1/16W, "RES SMD 100K OHM 1% 1/16W 0402", Manufacturer=Yageo, Manufacturer Part Number=RC0402FR-07100KL, Supplier Part Number 1=311-100KLRCT-ND, ComponentLink1Description=Digi-Key, ComponentLink1URL=https://www.digikey.com/en/products/detail/yageo/RC0402FR-07100KL/726526?s=N4IgTCBcDaIEoGEAMAWJYBicC0SDsAjEkgNIAyIAugL5A, Last modified by=J.Jaramillo, Last modified date=20240310, Reel Stock=N/A, Supplier 1=Digi-Key
R203 R205: library part Res_10k_0402_1/16W, "RES SMD 10K OHM 1% 1/16W 0402", Manufacturer=Yageo, Manufacturer Part Number=RC0402FR-0710KL, Supplier Part Number 1=311-10.0KLRCT-ND, ComponentLink1Description=Digi-Key, ComponentLink1URL=https://www.digikey.com/en/products/detail/yageo/RC0402FR-0710KL/726523?s=N4IgTCBcDaIEoGEAMAWJYBicC0SDsAjEgNIAyIAugL5A, Last modified by=J.Jaramillo, Last modified date=20240310, Reel Stock=N/A, Supplier 1=Digi-Key
R204: library part Res_523_SMD0805_130mW, "RES 523Ω ±0.1% 130mW 0805", Manufacturer=RESI, Manufacturer Part Number=PTFR0805B523RN9, Supplier Part Number 1=C47116002, ComponentLink1Description=LCSC, ComponentLink1URL=https://www.lcsc.com/es/product-detail/C47116002.html?s_z=n_q_t_resistor%2520523&spm=wm.fly.bg.3.xh___wm.ssy.tc.0.tz&lcsc_vid=QFZYVlcFRFBZAlcDFVQLVVBXQlJZV1IFTlhYAQVfQlcxVlNfRVZXUFxSQVRdVTsOAxUeFF5JWBYZEEoKFBINSQcJGk4LFEsFFhULAAsUDk5fVl1fWQkaCgg%3D, ComponentLink2Description=DataSheet, ComponentLink2URL=https://www.lcsc.com/datasheet/C47116002.pdf?spm=wm.sxq.inf.ggs___wm.fly.bg.3.xh&lcsc_vid=QFZYVlcFRFBZAlcDFVQLVVBXQlJZV1IFTlhYAQVfQlcxVlNfRVZXUFxSQVRdVTsOAxUeFF5JWBYZEEoKFBINSQcJGk4LFEsFFhULAAsUDk5fVl1fWQkaCgg%3D, Last modified by=H.Y.Pabón, Last modified date=20261023, Reel Stock=N/A, Supplier 1=LCSC
R206: library part Res_1.37k_0402_100mW, "RES 1.37kΩ ±1% 100mW 0402", Manufacturer=PANASONIC, Manufacturer Part Number=ERJ2RKF1371X, Supplier Part Number 1=C3025701, ComponentLink1Description=LCSC, ComponentLink1URL=https://www.lcsc.com/es/product-detail/C3025701.html?s_z=n_q_t_resistor%25201.37K&spm=wm.fly.bg.5.xh___wm.ssy.tc.0.tz&lcsc_vid=QFZYVlcFRFBZAlcDFVQLVVBXQlJZV1IFTlhYAQVfQlcxVlNfRVleX1FeRFFaUTsOAxUeFF5JWBYZEEoKFBINSQcJGk4LFEsFFhULAAsUDk5fVlxXWQkaCgg%3D, ComponentLink2Description=DataSheet, ComponentLink2URL=https://www.lcsc.com/datasheet/C3025701.pdf?spm=wm.sxq.inf.ggs___wm.fly.bg.5.xh&lcsc_vid=QFZYVlcFRFBZAlcDFVQLVVBXQlJZV1IFTlhYAQVfQlcxVlNfRVleX1FeRFFaUTsOAxUeFF5JWBYZEEoKFBINSQcJGk4LFEsFFhULAAsUDk5fVlxXWQkaCgg%3D, Last modified by=H.Y.Pabón, Last modified date=20261023, Reel Stock=N/A, Supplier 1=LCSC
R208: library part Res_22k1_0603_1/10W, "RES 22.1K OHM 1% 1/10W 0603", Manufacturer=YAGEO, Manufacturer Part Number=RC0603FR-0722K1L, Supplier Part Number 1=311-22.1KHRCT-ND, ComponentLink1Description=Digi-Key, ComponentLink1URL=https://www.digikey.com/en/products/detail/yageo/RC0603FR-0722K1L/727058?s=N4IgTCBcDaIEoGEAMA2JBmAYnAtEg7GGANICMAMiALoC%2BQA, Last modified by=J.Jaramillo, Last modified date=20240310, Reel Stock=N/A, Supplier 1=Digi-Key
R209: library part Res_100k_0805_1/8W, "RES SMD 100K OHM 1% 1/8W 0805", Manufacturer=Yageo, Manufacturer Part Number=RC0805FR-07100KL, Supplier Part Number 1=311-100KCRCT-ND, ComponentLink1Description=Digi-Key, ComponentLink1URL=https://www.digikey.com/product-detail/en/yageo/RC0805FR-07100KL/311-100KCRCT-ND/730491, Last modified by=J.Jaramillo, Last modified date=20240310, Reel Stock=N/A, Supplier 1=Digi-Key
R211: library part Res_240k_0603_1/10W, "RES SMD 240K OHM 1% 1/10W 0603", Manufacturer=Yageo, Manufacturer Part Number=RC0603FR-07240KL, Supplier Part Number 1=311-240KHRCT-ND, ComponentLink1Description=Digi-key, ComponentLink1URL=https://www.digikey.com/product-detail/en/yageo/RC0603FR-07240KL/311-240KHRCT-ND/730029, Last modified by=J.Jaramillo, Last modified date=20240310, Reel Stock=N/A, Supplier 1=Digi-Key
R212: library part Res_1k33_0603_1/10W, "RES SMD 1.33K OHM 1% 1/10W 0603", Manufacturer=Yageo, Manufacturer Part Number=RC0603FR-071K33L, Supplier Part Number 1=311-1.33KHRCT-ND, ComponentLink1Description=Digi-Key, ComponentLink1URL=https://www.digikey.com/product-detail/en/yageo/RC0603FR-071K33L/311-1-33KHRCT-ND/729806, Last modified by=J.Jaramillo, Last modified date=20240310, Reel Stock=N/A, Supplier 1=Digi-Key
R213: library part Res_100k_0603_1/10W, "RES 100k OHM 1% 1/10W 0603", Manufacturer="Stackpole Electronics Inc.", Manufacturer Part Number=RMCF0603FT100K, Supplier Part Number 1=RMCF0603FT100KCT-ND, ComponentLink1Description=Digi-Key, ComponentLink1URL=https://www.digikey.com/product-detail/en/stackpole-electronics-inc/RMCF0603FT100K/RMCF0603FT100KCT-ND/1943118, Last modified by=J.Jaramillo, Last modified date=20240310, Reel Stock=N/A, Supplier 1=Digi-Key
R214: library part Res_7.15k_SMD-0603_0.1W, "RES 7.15kΩ ±1% 100mW 0603", Manufacturer=ROHM, Supplier Part Number 1=C308303, ComponentLink1Description=LCSC, ComponentLink1URL=https://www.lcsc.com/es/product-detail/C308303.html?s_z=n_q_t_resistor%25207.15K&spm=wm.fly.bg.8.xh___wm.ssy.tc.0.tz&lcsc_vid=QlNYUQJQTlJZUFMERVVXUwJeTwJcUQUCFFBfX1MHEQAxVlNfRFNeUlBfTlhbUTsOAxUeFF5JWBYZEEoKFBINSQcJGk4LFEsFFhULAAsUDk5fVlxXWQkaCgg%3D, ComponentLink2Description=DataSheet, ComponentLink2URL=https://www.lcsc.com/datasheet/C308303.pdf?spm=wm.sxq.inf.ggs___wm.fly.bg.8.xh&lcsc_vid=QlNYUQJQTlJZUFMERVVXUwJeTwJcUQUCFFBfX1MHEQAxVlNfRFNeUlBfTlhbUTsOAxUeFF5JWBYZEEoKFBINSQcJGk4LFEsFFhULAAsUDk5fVlxXWQkaCgg%3D, Last modified by=H.Y.Pabón, Last modified date=20261028, Manufacturer Part Number=MCR03EZPFX7151, Reel Stock=N/A, Supplier 1=LCSC
T200 T201 T202 T203 T204 T205 T206 T207 T208 T209 T210 T211: library part TP_TH_30mil, "Test point 30mil hole size", Last modified by=J.Jaramillo, Last modified date=20240310
U200 U201 U202: library part DCDC_ADJ_5A_SOIC_8-EP, "High Efficiency Fast Response, 5A, 30V Input Synchronous Step Down Regulator", Manufacturer=Silergy, Supplier Part Number 1=C111875, ComponentLink1Description=LCSC, ComponentLink1URL=https://www.lcsc.com/es/product-detail/C111875.html?s_z=h_q_SY8205FCC, ComponentLink2Description=DataSheet, ComponentLink2URL=https://www.lcsc.com/datasheet/C111875.pdf?spm=wm.sxq.inf.ggs&lcsc_vid=QVMKUVJTRwALUwZUQwddBlJRRlRXBVVVTwcKAgEHQQUxVlNfRVdWVlFTT1RbUDsOAxUeFF5JWBYZEEoKFBINSQcJGk4LFEsFFhULAAsUDk5fV1ZfWQkaCgg%3D, Last modified by=H.Y.Pabón, Last modified date=22102026, Manufacturer Part Number=SY8205FCC, Reel Stock=N/A, Supplier 1=LCSC
U203: library part DCDC_ADJ-12V_4A_28-WFQFN, "Reductor Reguladores de conmutación IC Negativo Ajuste 0V 1 Salida 4A Placa descubierta 28-WFQFN", Manufacturer="Analog Devices Inc.", Manufacturer Part Number=LTC7149EUFD#PBF, Supplier Part Number 1=505-LTC7149EUFD#PBF-ND, ComponentLink1Description=DIGIKEY, ComponentLink1URL=https://www.digikey.com/es/products/detail/analog-devices-inc/LTC7149EUFD-PBF/5965250?s=N4IgTCBcDaIDIBUDCB2AjAFgJwFECqAYgCIDEACgEIEgC6AvkA, ComponentLink2Description=DataSheet, ComponentLink2URL=https://www.analog.com/media/en/technical-documentation/data-sheets/7149fa.pdf, Last modified by=H.Y.Pabón, Last modified date=20261028, Reel Stock=N/A, Supplier 1=DIGIKEY
U204: library part DCDC_ADJ_3.5A_WQFN-30-EP(4x6), "3.5-V to 60-V, 2.5-A/3.5-A Synchronous Step-Down Voltage Regulator", Manufacturer=TI, Supplier Part Number 1=C470958, ComponentLink1Description=LCSC, ComponentLink1URL=https://www.lcsc.com/es/product-detail/C470958.html?s_z=n_q_LM76003&spm=wm.fly.bg.0.xh&lcsc_vid=QFYKUlZeFgNbUQcDRgdXAlxeRQQMAgVWRFIMUlVSEgcxVlNfRFBcUFVUQlZbXzsOAxUeFF5JWBYZEEoKFBINSQcJGk4LFEs%3D, ComponentLink2Description=DataSheet, ComponentLink2URL=https://www.lcsc.com/datasheet/C470958.pdf?spm=wm.sxq.inf.ggs___wm.fly.bg.0.xh&lcsc_vid=QgdbVgdWEVMLUlVVRwdeVVcCFVcLVQFRRlhWUlFWQFUxVlNfRFFaUVZXQlFaVjsOAxUeFF5JWBYZEEoKFBINSQcJGk4LFEs%3D, Last modified by=H.Y.Pabón, Last modified date=20261027, Manufacturer Part Number=LM76003RNPR, Reel Stock=N/A, Supplier 1=LCSC
Var100: library part VAR_423V~517V_6.5kA_TH10mm, "VARISTOR 423V~517V 6.5kA P=10mm", Manufacturer=Brightking, Manufacturer Part Number=471KD20, Supplier Part Number 1=C522652, ComponentLink1Description=LCSC, ComponentLink1URL=https://www.lcsc.com/es/product-detail/C522652.html?s_z=n_q_t_varistor&spm=wm.fly.bg.3.stp___wm.ssy.tc.0.tz&lcsc_vid=Q1RbAgBVRVQPAlZeQVRYVAdeFgVZXwFeTgNaVQJTEwUxVlNfQ1VdXlFQQ1hYUTsOAxUeFF5JWBYZEEoKFBINSQcJGk4LFEsFFhULAAsUDk5fXldSWQkaCgg%3D, ComponentLink2Description=DataSheet, ComponentLink2URL=https://www.lcsc.com/datasheet/C522652.pdf?spm=wm.sxq.inf.ggs___wm.fly.bg.3.stp&lcsc_vid=Q1RbAgBVRVQPAlZeQVRYVAdeFgVZXwFeTgNaVQJTEwUxVlNfQ1VdXlFQQ1hYUTsOAxUeFF5JWBYZEEoKFBINSQcJGk4LFEsFFhULAAsUDk5fXldSWQkaCgg%3D, Last modified by=H.Y.Pabón, Last modified date=20261111, Reel Sotck=N/A, Supplier 1=LCSC
VR200: library part Pot_500k_1/5W_TH, "POT 500K OHM 1/5W PLASTIC LINEAR", Manufacturer="TT Electronics/BI", Manufacturer Part Number=P160KN-0QC15B500K, Supplier Part Number 1=987-1304-ND, ComponentLink1Description=Digi-key, ComponentLink1URL=https://www.digikey.com/products/en?keywords=987-1304-ND, Last modified by=J.Jaramillo, Last modified date=20240310, Reel Stock=N/A, Supplier 1=Digi-Key

## Via types
v1: diameter 19.68, hole 7.87, Top Layer to Bottom Layer, 18 vias

## Nets (pads, with @x,y where several pads share a name; then routed paths per layer and width w, separated by ;. In a path a pad name is that pad's centre, name@x,y a point inside that pad or via, vN(x,y) a via of type N, cw(c..) or ccw(c..) an arc to the next point about the centre after c; other vN are vias at no path point)
3V3: C214.1 C217.1 Con310.1 Con310.2 L202.2 R207.2 T205.1
5V0: C213.1 C216.1 Con306.1 Con306.2 L201.2 R205.2 T207.1
12V0: C212.1 C215.1 Con300.1 Con300.2 L200.2 R203.2 T206.1
24V: C218.1 C219.1 U203.3 U203.4
24V0: BR100.1 C102.1 C200.1 C201.1 C202.1 C220.1 R200.1 R201.1 R202.1 R209.2 T200.1 U200.7 U200.8 U201.7 U201.8 U202.7 U202.8 U204.20 U204.21 U204.22
-12V0: C218.2 C221.2 C222.2 C223.2 C227.2 C229.2 C230.2 C232.2 C233.2 Con308.1 Con308.2 R210.1 R211.1 T209.1 U203.1 U203.2 U203.10 U203.26 U203.27 U203.28 U203.29
GND: BR100.3 C102.2 C200.2 C201.2 C202.2 C203.2 C204.2 C205.2 C207.2 C209.2 C211.2 C215.2 C216.2 C217.2 C219.2 C220.2 C226.2 C228.2 C229.1 C230.1 C232.1 C233.1 Con301.1 Con301.2 Con303.1 Con303.2 Con305.1 Con305.2 Con307.1 Con307.2 Con309.1 Con309.2 Con311.1 Con311.2 L204.2 R204.1 R206.1 R208.1 T201.1 T202.1 T203.1 T204.1 T210.1 T211.1 U200.9 U201.9 U202.9 U203.6 U203.7 U203.13 U203.16 U204.7 U204.9 U204.13 U204.14 U204.15 U204.17 U204.19 U204.23 U204.24 U204.25 U204.26 U204.27 U204.28 U204.29 U204.30 U204.31 VR200.3
  other v1: 2821.69,3796.69 2865,3796.69 2821.69,3840 2865,3840 2821.69,3883.31 2865,3883.31 2833.35,4836.69 2876.65,4836.69 2833.35,4880 2876.65,4880 2833.35,4923.31 2876.65,4923.31 2838.35,6046.69 2881.65,6046.69 2838.35,6090 2881.65,6090 2838.35,6133.31 2881.65,6133.31
NetBR100_2: BR100.2 C101.1 Con_104.1 Con_104.2
NetBR100_4: BR100.4 C101.2 Con_105.1 Con_105.2
NetC100_1: C100.1 Con_102.1 Con_102.2 F100.2 Var100.2
NetC100_2: C100.2 Con_103.1 Con_103.2 J100.2 Var100.1
NetC203_1: C203.1 U200.4
NetC204_1: C204.1 U201.4
NetC205_1: C205.1 U202.4
NetC206_1: C206.1 U200.1
NetC206_2: C206.2 L200.1 U200.2
NetC207_1: C207.1 U200.6
NetC208_1: C208.1 U201.1
NetC208_2: C208.2 L201.1 U201.2
NetC209_1: C209.1 U201.6
NetC210_1: C210.1 U202.1
NetC210_2: C210.2 L202.1 U202.2
NetC211_1: C211.1 U202.6
NetC212_2: C212.2 R203.1 R204.2 U200.5
NetC213_2: C213.2 R205.1 R206.2 U201.5
NetC214_2: C214.2 R207.1 R208.2 U202.5
NetC221_1: C221.1 U203.11 U203.17
NetC222_1: C222.1 R211.2 U203.14
NetC223_1: C223.1 R212.1
NetC224_1: C224.1 L203.1 U204.1 U204.2 U204.3 U204.4 U204.5
NetC224_2: C224.2 U204.6
NetC225_1: C225.1 U203.18
NetC225_2: C225.2 L204.1 U203.19 U203.20 U203.21 U203.22 U203.23 U203.24 U203.25
NetC226_1: C226.1 U204.8
NetC227_1: C227.1 R212.2 U203.15
NetC231_2: C231.2 R213.1 R214.2 U204.12
NetCon_100_1: Con_100.1 Con_100.2 J100.1
NetCon_101_1: Con_101.1 Con_101.2 F100.1
NetR200_2: R200.2 U200.3
NetR201_2: R201.2 U201.3
NetR202_2: R202.2 U202.3
NetR209_1: R209.1 U204.18
NetR210_2: R210.2 U203.12
NetR214_1: R214.1 VR200.1 VR200.2
var: C228.1 C231.1 Con302.1 Con302.2 Con304.1 Con304.2 L203.2 R213.2 T208.1
pads on no net: U203.5 U203.8 U203.9 U204.10 U204.11 U204.16 U204.V

## Silkscreen, mask and mechanical layers (free items; w line width, h text height)
Top Overlay:
  lines w10: 2024.09,3300.17 3724.09,3300.17 3724.09,4220.17 2024.09,4220.17 2024.09,3300.17 ; 2024.09,4299.81 3724.09,4299.81 3724.09,5199.81 2024.09,5199.81 2024.09,4299.81 ; 2025,1220 3725,1220 3725,2170 2025,2170 2025,1220 ; 2025.09,2286.62 3725.09,2286.62 3725.09,3206.62 2025.09,3206.62 2025.09,2286.62 ; 2026.08,5272.65 3726.08,5272.65 3726.08,6472.65 2026.08,6472.65 2026.08,5272.65
  text "+12V DC" at 3245,6375 h70
  text "+5V DC" at 3305,5105 h70
  text "+3V3 DC" at 3230,4120 h70
  text "-12V0 DC" at 3170,3110 h70
  text "+1V25-15V0 DC" at 2050,2070 h70
  text "Design by: H.Y.Pabon" at 2495,74.99 h60
Mechanical 2:
  circle w0.5: c196.6,196.85 r81.38
  circle w0.5: c3802.76,6732.28 r81.38
  circle w0.5: c3802.76,196.85 r81.38
  circle w0.5: c196.6,6732.28 r81.38
  lines w0.5: 0,0 0,6929.13 ; 0,0 4000,0 ; 0,0 4000,0 ; 0,6929.13 4000,6929.13 ; 0,6929.13 4000,6929.13 ; 4000,0 4000,6929.13

## Dimensions
0,6929.13 to 4000,6929.13 on Mechanical 2
0,6929.13 to 0,0 on Mechanical 2

## Text inside footprints (layer, text, board x,y; h text height)
BR100: Top Overlay "+" at 465.49,4620 h80; Top Overlay "~" at 465.49,4172.1 h80; Top Overlay "-" at 1380.49,4163 h80; Top Overlay "~" at 1395.49,4892.1 h80
C215: Top Overlay "+" at 2278.19,5639.25 h60 r270